# Altium PCB PCB.PcbDoc (part 9 of 10)
Units mm, origin at the board's own origin, x right, y up, seen from the top; angles counter-clockwise.
Board outline 100.5 x 147.95 mm, 6 copper layers (Top Layer, Layer 2 (GND), Layer 3, Layer 4, Layer 5 (AGND), Bottom Layer), stack 1.449 mm thick; 511 components, 297 nets, 1620 pads, 565 vias.
Unrouted connection lines stored in the file: 597.
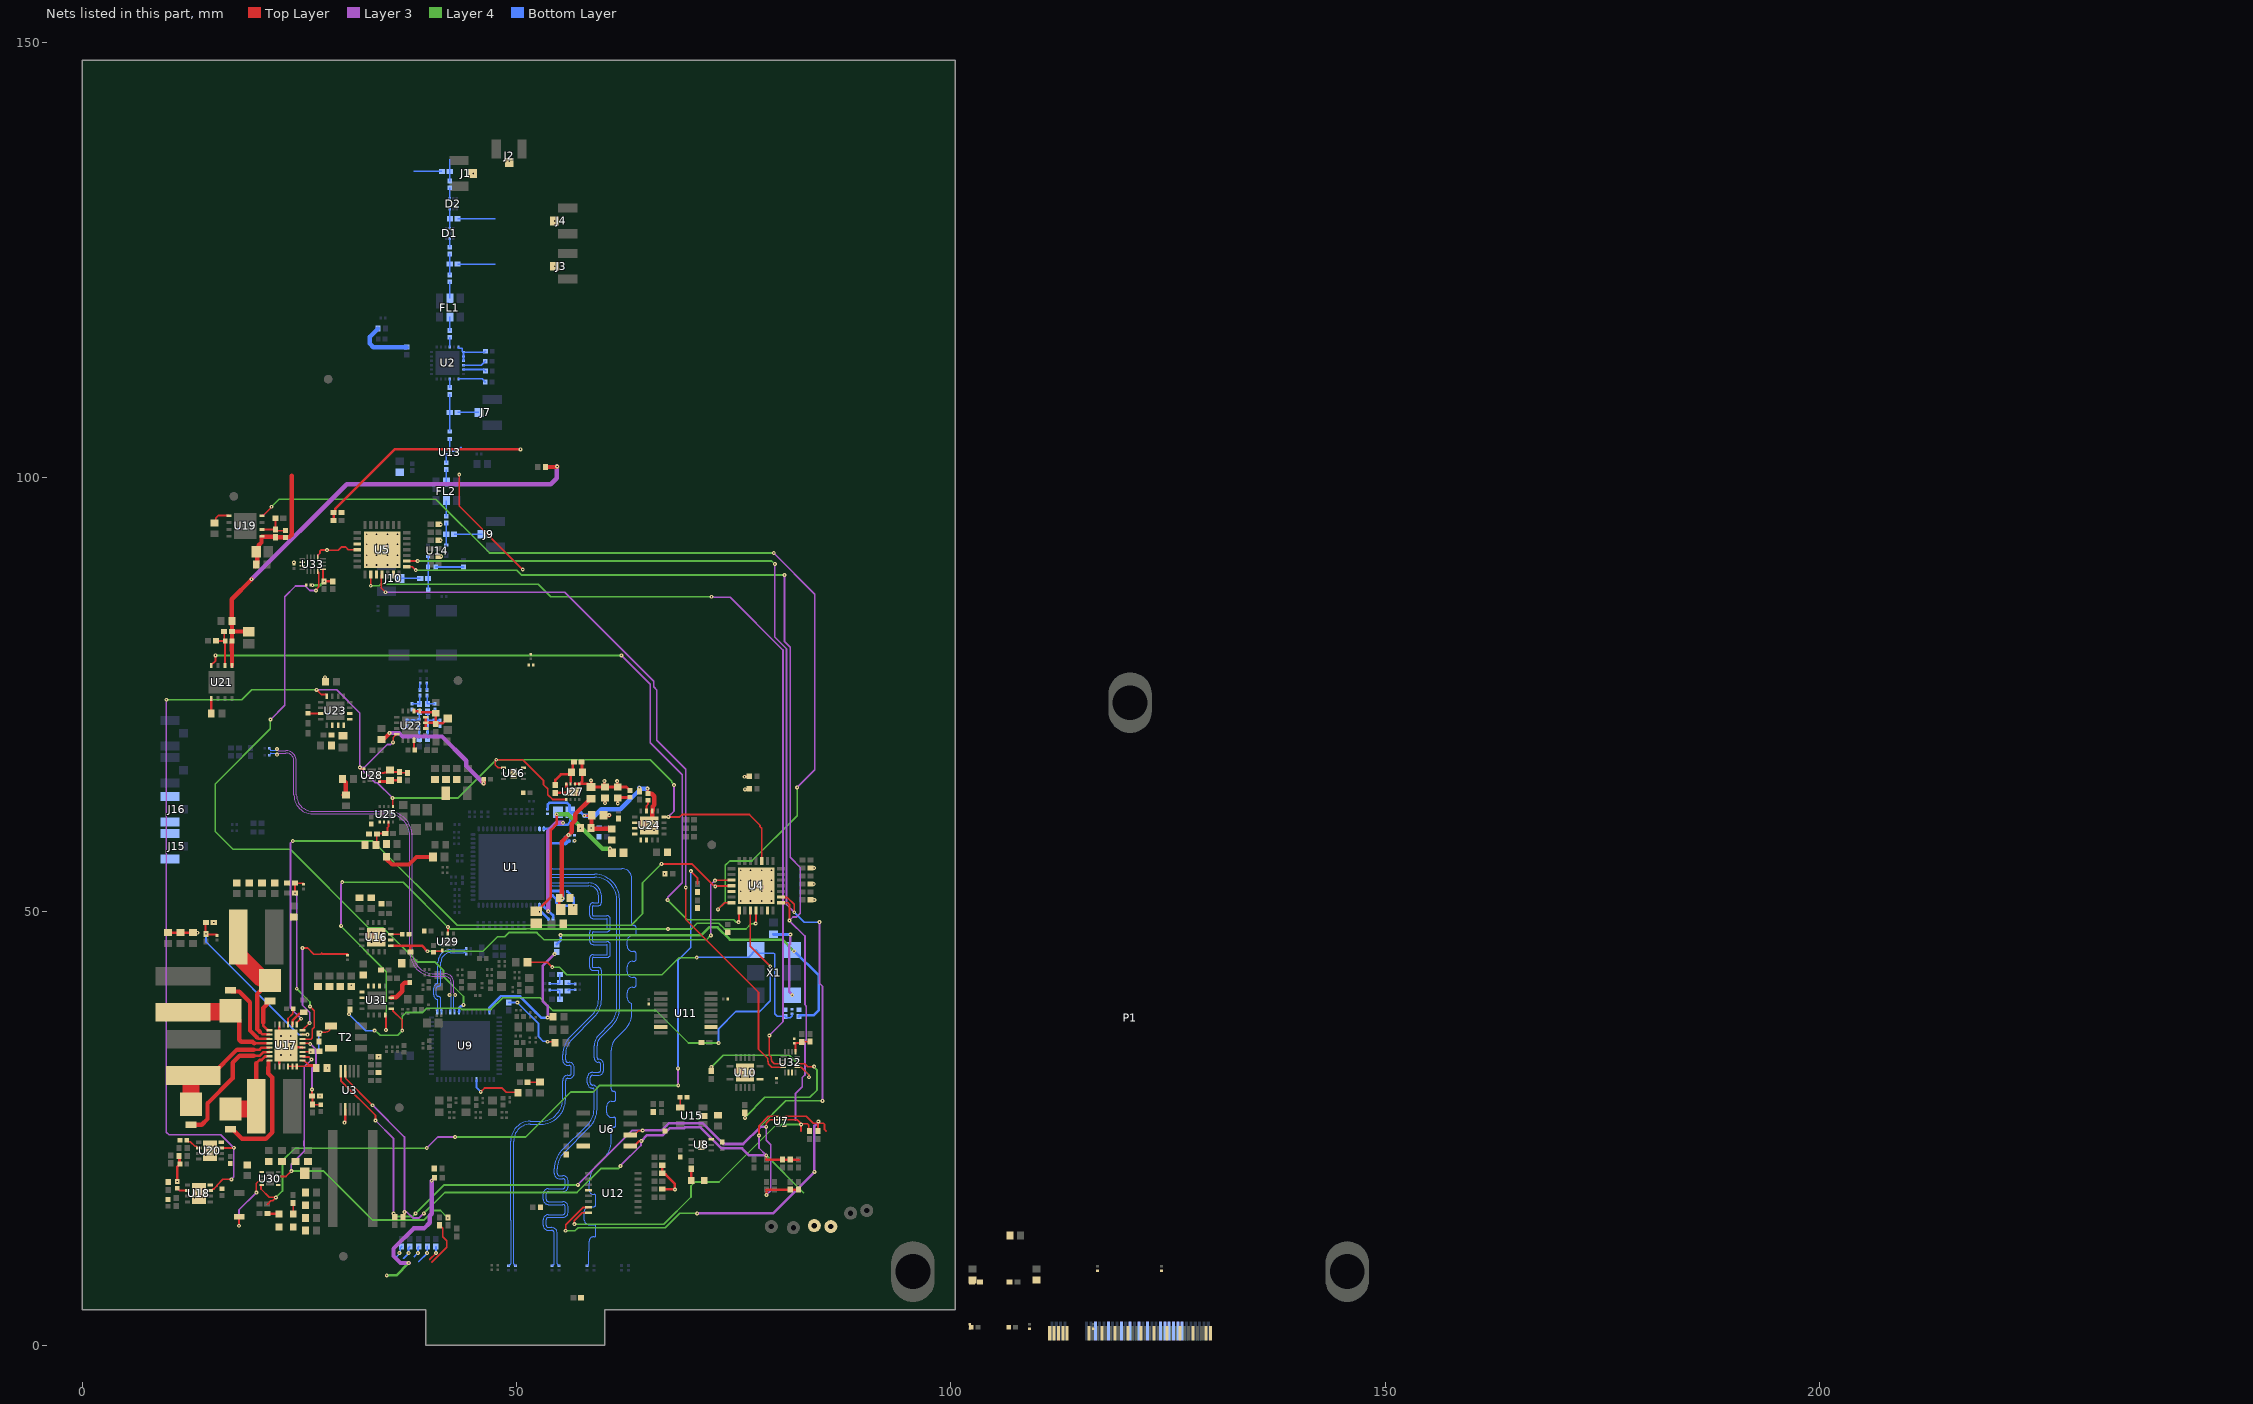
[diagram p6: the nets of this part, all layers, seen from the top]

## Via types
v1: diameter 0.45, hole 0.15, Top Layer to Bottom Layer, 432 vias
v2: diameter 0.5, hole 0.2, Top Layer to Bottom Layer, 132 vias
v3: diameter 0.6, hole 0.2, Top Layer to Bottom Layer, 1 vias

## Nets (pads, with @x,y where several pads share a name; then routed paths per layer and width w, separated by ;. In a path a pad name is that pad's centre, name@x,y a point inside that pad or via, vN(x,y) a via of type N, cw(c..) or ccw(c..) an arc to the next point about the centre after c; other vN are vias at no path point) (continued)
CMLout2_P: C18.1 U1.25 | length 65.2
  Bottom Layer w0.138: U1.25@53.787,54.872 53.924,54.872 ccw(c53.924,55.011) 54.022,54.913 cw(c54.12,54.815) 54.12,54.953 62.104,54.953 cw(c62.104,53.813) 63.244,53.813 63.244,48.638 ccw(c63.48,48.638) 63.48,48.402 cw(c63.48,48.124) 63.758,48.124 63.758,47.527 cw(c63.48,47.527) 63.48,47.249 63.346,47.249 ccw(c63.346,46.633) 62.73,46.633 62.73,46.036 ccw(c63.346,46.036) 63.346,45.42 63.48,45.42 cw(c63.48,45.142) 63.758,45.142 63.758,44.545 cw(c63.48,44.545) 63.48,44.267 63.346,44.267 ccw(c63.346,43.651) 62.73,43.651 62.73,43.054 ccw(c63.346,43.054) 63.346,42.438 63.48,42.438 cw(c63.48,42.159) 63.758,42.159 63.758,41.563 cw(c63.48,41.563) 63.48,41.284 63.346,41.284 ccw(c63.346,40.668) 62.73,40.668 62.73,40.072 ccw(c63.346,40.072) 63.244,39.464 63.244,38.217 cw(c60.84,38.217) 62.54,36.517 61.45,35.427 ccw(c62.823,34.055) 60.882,34.055 60.882,29.612 ccw(c61.192,29.612) 61.192,29.302 cw(c61.192,29.098) 61.396,29.098 61.396,28.352 cw(c61.192,28.352) 61.192,28.148 60.909,28.148 ccw(c60.909,27.607) 60.368,27.607 60.368,26.861 ccw(c60.909,26.861) 60.909,26.319 61.192,26.319 cw(c61.192,26.115) 61.396,26.115 61.396,25.37 cw(c61.192,25.37) 61.192,25.166 ccw(c61.192,24.856) 60.882,24.856 60.882,23.516 cw(c58.342,23.516) 60.138,21.72 59.176,20.758 ccw(c61.207,18.727) 58.335,18.727 58.335,17.965 ccw(c58.853,17.965) 58.853,17.447 58.923,17.447 cw(c58.923,17.267) 59.103,17.267 59.103,16.219 cw(c58.923,16.219) 58.923,16.039 58.315,16.039 ccw(c58.315,15.521) 57.797,15.521 57.797,14.474 ccw(c58.315,14.474) 58.315,13.957 58.923,13.957 cw(c58.923,13.776) 59.103,13.776 59.103,12.729 cw(c58.923,12.729) 58.923,12.549 58.853,12.549 ccw(c58.853,12.031) 58.335,12.031 58.335,10.929 58.326,10.92 58.326,9.46 cw(c58.188,9.46) 58.285,9.363 58.272,9.35 cw(c58.207,9.414) 58.207,9.323 ccw(c58.207,9.231) C18.1@58.143,9.296 ; C18.1@58.088,9.242 C18.1@58.142,9.296
CMLout3_N: C233.1 U1.26 | length 64.9
  Bottom Layer w0.138: U1.26@53.787,54.372 53.981,54.372 54.062,54.291 58.977,54.291 cw(c58.977,51.413) 61.855,51.413 61.855,38.911 cw(c58.983,38.911) 61.013,36.88 59.673,35.54 ccw(c60.679,34.534) 59.256,34.534 59.256,33.144 ccw(c59.409,33.144) 59.409,32.992 cw(c59.409,32.376) 60.025,32.376 60.025,31.779 cw(c59.409,31.779) 59.409,31.163 58.767,31.163 ccw(c58.767,30.885) 58.488,30.885 58.488,30.288 ccw(c58.767,30.288) 58.767,30.01 cw(c58.767,29.52) 59.256,29.52 59.256,27.245 cw(c56.385,27.245) 58.415,25.215 55.403,22.202 ccw(c57.199,20.406) 54.659,20.406 54.659,19.872 ccw(c54.938,19.872) 54.938,19.593 55.319,19.593 cw(c55.319,18.977) 55.935,18.977 55.935,18.38 cw(c55.319,18.38) 55.319,17.764 53.661,17.764 ccw(c53.661,17.486) 53.383,17.486 53.383,16.889 ccw(c53.661,16.889) 53.661,16.611 55.319,16.611 cw(c55.319,15.995) 55.935,15.995 55.935,15.398 cw(c55.319,15.398) 55.319,14.782 53.661,14.782 ccw(c53.661,14.503) 53.383,14.503 53.383,13.907 ccw(c53.661,13.907) 53.661,13.628 54.043,13.628 cw(c54.043,13.012) 54.659,13.012 54.659,9.811 54.65,9.802 54.65,9.46 ccw(c54.788,9.46) 54.69,9.363 54.704,9.35 ccw(c54.769,9.414) 54.769,9.323 cw(c54.769,9.231) 54.833,9.296 C233.1@54.888,9.242
CMLout3_P: C234.1 U1.27 | length 64.4
  Bottom Layer w0.138: U1.27@53.787,53.872 53.981,53.872 54.062,53.953 58.977,53.953 cw(c58.977,51.413) 61.517,51.413 61.517,38.914 cw(c58.977,38.914) 60.773,37.117 59.433,35.777 ccw(c60.674,34.536) 58.919,34.536 58.919,33.144 ccw(c59.409,33.144) 59.409,32.654 cw(c59.409,32.376) 59.687,32.376 59.687,31.779 cw(c59.409,31.779) 59.409,31.501 58.767,31.501 ccw(c58.767,30.885) 58.151,30.885 58.151,30.288 ccw(c58.767,30.288) 58.767,29.672 cw(c58.767,29.52) 58.919,29.52 58.919,27.248 cw(c56.379,27.248) 58.175,25.452 55.163,22.439 ccw(c57.193,20.409) 54.322,20.409 54.322,19.872 ccw(c54.938,19.872) 54.938,19.255 55.319,19.255 cw(c55.319,18.977) 55.598,18.977 55.598,18.38 cw(c55.319,18.38) 55.319,18.102 53.661,18.102 ccw(c53.661,17.486) 53.045,17.486 53.045,16.889 ccw(c53.661,16.889) 53.661,16.273 55.319,16.273 cw(c55.319,15.995) 55.598,15.995 55.598,15.398 cw(c55.319,15.398) 55.319,15.12 53.661,15.12 ccw(c53.661,14.503) 53.045,14.503 53.045,13.907 ccw(c53.661,13.907) 53.661,13.291 54.043,13.291 cw(c54.043,13.012) 54.322,13.012 54.322,12.182 54.322,9.951 54.312,9.942 54.312,9.46 cw(c54.175,9.46) 54.272,9.363 54.259,9.35 cw(c54.194,9.414) 54.194,9.323 ccw(c54.194,9.231) C234.1@54.129,9.296 ; C234.1@54.075,9.242 C234.1@54.129,9.296
CMLout4_N: C235.1 U1.28 | length 65.3
  Bottom Layer w0.138: C235.1@49.884,9.242 49.829,9.296 ccw(c49.765,9.231) 49.765,9.323 cw(c49.765,9.414) 49.7,9.35 49.687,9.363 cw(c49.784,9.46) 49.646,9.46 49.646,14.484 49.642,14.489 49.642,17.592 49.642,23.573 cw(c51.586,23.573) 51.586,25.517 52.754,25.517 ccw(c52.754,28.395) 55.632,28.395 55.632,30.546 cw(c55.893,30.546) 55.893,30.808 56.038,30.808 ccw(c56.038,31.424) 56.654,31.424 56.654,32.02 ccw(c56.038,32.02) 56.038,32.636 55.91,32.636 cw(c55.91,32.915) 55.632,32.915 55.632,33.515 cw(c58.172,33.515) 56.376,35.311 58.931,37.866 ccw(c56.9,39.897) 59.772,39.897 59.772,43.169 ccw(c59.379,43.169) 59.379,43.561 58.805,43.561 cw(c58.805,43.616) 58.75,43.616 58.75,44.66 cw(c58.805,44.66) 58.805,44.715 60.402,44.715 ccw(c60.402,45.107) 60.794,45.107 60.794,46.151 ccw(c60.402,46.151) 60.402,46.544 58.805,46.544 cw(c58.805,46.599) 58.75,46.599 58.75,47.642 cw(c58.805,47.642) 58.805,47.697 60.402,47.697 ccw(c60.402,48.09) 60.794,48.09 60.794,49.134 ccw(c60.402,49.134) 60.402,49.526 58.805,49.526 cw(c58.805,49.581) 58.75,49.581 58.75,50.625 cw(c58.805,50.625) 58.805,50.68 59.379,50.68 ccw(c59.379,51.072) 59.772,51.072 59.772,51.831 ccw(c58.312,51.831) 58.312,53.291 54.12,53.291 cw(c54.12,53.429) 54.022,53.331 ccw(c53.924,53.233) 53.924,53.372 U1.28@53.787,53.372
CMLout4_P: C236.1 U1.29 | length 64.8
  Bottom Layer w0.138: C236.1@49.071,9.242 C236.1@49.125,9.296 ; C236.1@49.126,9.296 cw(c49.19,9.231) 49.19,9.323 ccw(c49.19,9.414) 49.255,9.35 49.268,9.363 ccw(c49.171,9.46) 49.309,9.46 49.3,14.468 49.304,14.473 49.304,23.573 cw(c51.586,23.573) 51.586,25.855 52.754,25.855 ccw(c52.754,28.395) 55.294,28.395 55.294,30.546 cw(c55.893,30.546) 55.893,31.145 56.038,31.145 ccw(c56.038,31.424) 56.316,31.424 56.316,32.02 ccw(c56.038,32.02) 56.038,32.299 55.91,32.299 cw(c55.91,32.915) 55.294,32.915 55.294,33.517 cw(c58.166,33.517) 56.135,35.548 58.69,38.103 ccw(c56.894,39.899) 59.434,39.899 59.434,43.169 ccw(c59.379,43.169) 59.379,43.224 58.805,43.224 cw(c58.805,43.616) 58.412,43.616 58.412,44.66 cw(c58.805,44.66) 58.805,45.053 60.402,45.053 ccw(c60.402,45.107) 60.456,45.107 60.456,46.151 ccw(c60.402,46.151) 60.402,46.206 58.805,46.206 cw(c58.805,46.599) 58.412,46.599 58.412,47.642 cw(c58.805,47.642) 58.805,48.035 60.402,48.035 ccw(c60.402,48.09) 60.456,48.09 60.456,49.134 ccw(c60.402,49.134) 60.402,49.188 58.805,49.188 cw(c58.805,49.581) 58.412,49.581 58.412,50.625 cw(c58.805,50.625) 58.805,51.017 59.379,51.017 ccw(c59.379,51.072) 59.434,51.072 59.434,51.831 ccw(c58.312,51.831) 58.312,52.953 54.12,52.953 ccw(c54.12,52.815) 54.022,52.913 cw(c53.924,53.011) 53.924,52.872 U1.29@53.787,52.872
CTRL_VCXO: C222.1 R89.1 U9.41 | length 17.5
  Top Layer w0.3: v1(53.567,37.811) 54.13,37.811 C222.1@54.208,37.889
  Layer 3 w0.3: v1(53.567,37.811) 53.567,39.145 53.006,39.706 53.006,43.727 v1(54.38,45.1)
  Bottom Layer w0.3: U9.41@46.861,38.452 46.861,38.928 48.171,40.238 50.403,40.238 52.881,37.76 52.903,37.782 53.538,37.782 v1(53.567,37.811)
DCDC_PG1: R137.1 U4.25 U17.23 | length 82.8
  Top Layer w0.2: U17.23@24.684,36.986 24.684,37.211 25.132,37.658 v1(25.195,37.658) ; v1(66.673,55.489) 70.173,55.489 72.628,53.034 v1@72.998,53.034 ; v1(72.871,52.898) 72.909,52.936 74.682,52.936 U4.25@74.72,52.974
  Layer 3 w0.2: v1(24.23,58.131) 23.959,57.86 23.959,38.894 v1(25.195,37.658)
  Layer 4 w0.2: v1(24.23,58.131) 33.425,58.131 43.144,48.411 50.946,48.411 50.963,48.428 63.181,48.428 64.489,49.736 64.489,53.305 v1(66.673,55.489) ; v1(25.195,37.658) v1@25.231,37.694
DCDC_PG2: R136.1 U4.26 U30.8 | length 84.9
  Top Layer w0.2: U30.8@20.639,18.506 20.595,18.506 20.57,18.481 20.57,18.058 21.525,17.103 22.251,17.103 v1(22.28,17.074) 21.909,16.703 21.713,16.703 21.332,16.322 21.282,16.322 21.308,16.297 ; v1(70.051,54.651) 70.813,53.889 70.813,53.17
  Layer 3 w0.2: v1(39.648,22.774) 40.918,24.044 v1(42.924,24.044) ; v1(68.578,31.952) 68.591,31.94 68.591,30 v1(68.604,29.987)
  Layer 4 w0.2: v1@22.193,16.988 v1(22.28,17.074) 23.036,17.831 23.036,21.301 24.484,22.748 39.622,22.748 v1(39.648,22.774) ; v1(42.924,24.044) 51.046,24.044 56.228,29.225 58.825,29.225 59.587,29.987 v1(68.604,29.987)
  Bottom Layer w0.2: v1(68.578,31.952) 68.578,44.395 70.051,45.868 v1(70.051,54.651)
DGND: C85.1 C86.1 C87.1 C88.1 C89.1 C90.1 C91.1 C95.1 FB35.2 R70.1 U1.16 U1.33 U24.6 U24.17 U26.3 U26.7 | length 42.7
  Top Layer w0.3: v1(57.798,61.026) 58.607,61.026 58.622,61.041 FB35.2@58.658,61.077 ; R70.1@64.133,63.806 v1(64.133,64.252) ; v1(65.048,64.15) 65.076,64.122 65.076,63.648 C87.1@65.124,63.601
  Top Layer w0.5: FB35.2@58.622,61.041 58.622,59.64 v1(58.604,59.622) C86.1@58.586,59.604 58.642,59.548 60.902,59.548 C85.1@60.958,59.492 ; C87.1@65.124,63.601 65.124,63.596 65.144,63.576 65.55,63.576 65.844,63.282 65.844,62.289 65.651,62.097 65.651,61.634 U24.6@65.601,61.584 65.601,60.234 U24.17@65.276,59.909
  Layer 3 w0.5: v1(53.643,50.053) 53.643,59.263 54.602,60.222 v1(55.342,60.222)
  Bottom Layer w0.3: U1.33@53.137,50.722 53.137,50.572 53.166,50.544 53.166,50.531 v1(53.643,50.053) 54.202,49.571 C88.1@54.202,49.287 ; U1.16@53.137,59.522 53.815,59.522 54.303,60.01 55.904,60.01 56.081,60.188 56.081,60.253 56.161,60.333 C90.1@56.161,61.433 ; C89.1@53.567,61.775 53.577,61.775 53.577,62.332 53.77,62.525 55.802,62.525 56.081,62.245 56.081,61.512 C90.1@56.161,61.433 ; v1(57.798,61.026) 57.417,61.407 56.186,61.407 C90.1@56.161,61.433
  Bottom Layer w0.5: v1(57.798,61.026) 58.99,61.026 59.741,61.777 60.933,61.777 60.937,61.774 61.924,61.774 64.133,63.983 v1(64.133,64.252) 64.235,64.15 v1(65.048,64.15)
  other v2: 64.726,59.359 65.826,59.359 64.726,60.459 65.826,60.459
DRGND: C127.1 C128.1 C129.1 C130.1 C132.1 C133.1 C134.1 C135.1 FB5.1 FB6.1 FB7.1 FB8.1 FB9.1 FB35.1 FB36.1 R74.1 U1.18 U1.31 U27.4 U27.9 | length 13.4
  Top Layer w0.3: R74.1@54.441,63.668 56.335,63.668 v1(56.462,63.795) 56.162,63.795 55.812,64.145 55.812,64.3 55.737,64.375 55.737,64.67 U27.4@55.712,64.695 ; v1(60.171,62.474) 60.171,63.09 C129.1@60.173,63.093 ; v1(61.644,62.449) 61.644,63.086 C130.1@61.637,63.093 61.671,63.126 63.008,63.126 C128.1@63.041,63.16 ; v1(76.224,65.522) 76.242,65.54 76.764,65.54 FB7.1@76.782,65.558 ; v1(76.3,64.074) 76.324,64.098 76.759,64.098 FB8.1@76.782,64.122
  Top Layer w0.5: FB35.1@60.008,61.077 60.033,61.102 v1(60.653,61.102)
  Bottom Layer w0.3: U1.31@53.787,51.872 54.144,51.872 54.557,51.459 54.557,51.05 54.945,50.663 v1(56.564,50.663) 56.564,51.573 55.833,52.304 C134.1@55.833,52.314
  other v1: 67.029,54.346 56.691,58.156
DRVDD_1.25V: C127.2 C132.2 C133.2 C134.2 C135.2 FB14.2 U1.19 U1.30 | length 20.2
  Top Layer w0.3: C127.2@54.908,51.577 54.908,50.4 C135.2@55.077,50.231
  Top Layer w0.5: C127.2@55.21,51.6 55.21,58.047 v1(55.98,58.816) 56.365,59.201 56.365,60.119 56.75,60.504 56.75,61.222 58.521,62.993 FB14.2@58.571,62.993
  Bottom Layer w0.3: U1.30@53.787,52.372 55.209,52.372 C134.2@55.278,52.441 ; U1.19@53.787,57.872 55.599,57.872 55.791,57.872 56.04,58.121 56.05,58.121 C133.2@56.05,58.131 ; C134.2@55.233,52.314 C134.2@55.313,52.314
  Bottom Layer w0.5: v1@55.233,51.404 C134.2@55.233,52.314 ; 55.599,57.872 55.599,58.435 v1(55.98,58.816)
  other v1: 55.269,51.527
DVDD_1.25V: C86.2 C88.2 C89.2 C90.2 C91.2 FB12.2 U1.15 U1.34 | length 22
  Top Layer w0.3: v1(52.627,49.977) 52.627,50.362 53.937,51.672 53.937,59.416 54.608,60.087 v1(54.608,61.204)
  Layer 4 w0.5: v1(54.608,61.204) 55.918,61.204 59.881,57.242 v1(60.755,57.242)
  Bottom Layer w0.3: U1.34@52.637,50.722 52.637,50.013 52.627,50.003 v1(52.627,49.977) 52.656,49.949 52.863,49.949 53.662,49.149 C88.2@53.662,49.139
  other v1: 57.336,59.604
EN_04610: U4.4 U29.2 U31.4 | length 73.9
  Top Layer w0.2: U31.4@34.857,38.091 34.949,38 v1(34.949,36.363) ; U29.2@42.086,47.472 v1(42.086,48.225) ; v1(77.519,48.631) 77.544,48.656 77.544,50.099 U4.4@77.57,50.124
  Layer 3 w0.2: v1(29.792,48.352) 29.792,53.186 29.919,53.313 v1(29.919,53.381)
  Layer 4 w0.2: v1(29.792,48.352) 29.792,48.284 29.788,48.28 34.982,43.086 34.982,36.396 v1(34.949,36.363) ; v1(29.919,53.381) 36.93,53.381 v1(42.086,48.225) 42.315,47.996 51.097,47.996 51.114,48.013 51.549,48.013 51.566,47.996 v1(67.435,47.996) 70.102,47.996 70.763,48.656 73.279,48.656 73.939,47.996 76.407,47.996 76.995,48.583 77.471,48.583 v1(77.519,48.631)
EN_9690_Power: U4.17 U18.3 U20.3 U22.4 U23.4 U24.4 U25.5 U26.4 U27.5 U28.5 | length 178.3
  Top Layer w0.2: U18.3@14.725,17.884 14.85,17.884 15.025,18.059 15.149,18.059 15.504,18.414 15.504,18.488 16.185,19.169 v1(17.155,19.169) ; U20.3@15.999,22.792 17.431,22.792 v1(17.444,22.805) ; v1(26.973,75.53) 27.506,74.996 28.091,74.996 28.141,74.946 U23.4@28.141,74.796 ; v1@31.951,66.441 32.428,66.441 U28.5@32.433,66.445 ; v1(35.711,63.084) 35.73,63.064 35.73,62.123 U25.5@35.749,62.104 ; v1(35.761,69.484) 35.804,69.527 35.804,70.045 U22.4@36.189,70.429 ; U26.4@48.494,66.549 47.866,66.549 47.547,66.868 47.547,67.376 v1(47.649,67.478) 50.714,67.478 53.084,65.108 53.084,64.633 53.575,64.143 53.575,63.46 54.14,62.895 U27.5@55.712,62.895 ; v1(67.461,60.899) 68.781,60.899 69.051,61.169 76.799,61.169 78.021,59.947 78.021,59.782 78.22,59.582 U4.17@78.22,55.824
  Layer 3 w0.2: v1(9.676,74.387) 9.676,24.605 9.982,24.299 15.949,24.299 v1(17.444,22.805) 17.444,19.457 v1(17.155,19.169) ; v1(26.973,75.53) 29.284,75.53 31.951,72.863 v1(31.951,66.589) ; v1(35.711,63.084) 33.958,64.836 33.704,64.836 v1(31.951,66.589) ; v1(35.761,69.484) 35.513,69.236 35.119,69.236 32.472,66.589 v1(31.951,66.589) ; v1(67.461,60.899) 68.121,61.56 v1(68.121,64.557)
  Layer 4 w0.2: v1(9.676,74.387) 18.362,74.387 19.505,75.53 v1(26.973,75.53) ; v1(35.711,63.084) 43.28,63.084 v1@47.674,67.478 ; v1(47.649,67.478) v1@47.674,67.478 ; v1(68.121,64.557) 68.121,64.624 67.867,64.878 67.867,64.989 65.378,67.478 v1@47.674,67.478
EN_DCDC: R42.2 U17.16 U30.3 | length 38.1
  Top Layer w0.2: U30.3@22.539,19.506 22.542,19.509 23.449,19.509 v1(24.059,20.119) ; U17.16@25.334,33.336 25.409,33.261 26.087,33.261 v1(26.389,32.959) ; v1(42.086,14.722) R42.2@42.086,14.791
  Layer 3 w0.2: v1(24.059,20.119) 24.059,20.902 25.551,22.393 25.551,23.073 25.508,23.115 25.508,23.55 25.551,23.593 25.551,32.121 v1(26.389,32.959)
  Layer 4 w0.2: v1(24.059,20.119) 27.788,20.119 33.424,14.483 39.287,14.483 40.384,15.58 41.228,15.58 v1(42.086,14.722)
EN_LNA: R30.1 R33.2 U13.6 | length 26.7
  Top Layer w0.3: R30.1@28.936,95.037 R33.2@28.936,95.951 28.986,95.951 29.136,96.101 29.136,96.396 35.955,103.215 v1(50.455,103.215)
  Bottom Layer w0.2: U13.6@42.7,103.059 43.216,103.059 43.621,103.465
EN_PWR_RF_2.8: U4.1 U21.8 | length 90.5
  Top Layer w0.2: U21.8@14.826,78.319 14.806,78.338 15.34,78.871 v1(15.34,79.492) ; v1(75.563,48.783) 75.592,48.812 75.592,50.096 U4.1@75.62,50.124
  Layer 3 w0.2: v1(62.06,79.492) 65.378,76.174 65.378,69.434 69.067,65.744 69.067,53.336 67.384,51.654 v1(67.384,51.323)
  Layer 4 w0.2: v1(15.34,79.492) v1(62.06,79.492) ; v1(67.384,51.323) 69.645,49.063 75.004,49.063 75.284,48.783 v1(75.563,48.783)
EN_PWR_RF_5: U4.28 U19.8 | length 113.3
  Top Layer w0.2: U19.8@20.676,95.591 20.826,95.591 21.78,96.545 v1(21.78,96.606) ; v1(73.176,50.257) 73.943,51.024 U4.28@74.72,51.024
  Layer 3 w0.2: v1(79.602,91.278) 84.335,86.545 84.335,66.343 v1(82.294,64.303)
  Layer 4 w0.2: v1(21.78,96.606) 22.649,97.475 40.689,97.475 46.887,91.278 v1(79.602,91.278) ; v1(73.176,50.257) 74.014,51.095 74.014,55.311 74.522,55.819 77.087,55.819 82.294,61.026 v1(82.294,64.303)
EN_TRANSLATOR_2.5_1.8: R145.2 U5.24
GND: C33.1 C34.1 C35.1 C36.1 C37.1 C38.1 C39.1 C40.2 C41.2 C42.2 C43.2 C44.1 C45.1 C46.1 C47.1 C48.1 C50.1 C51.1 C52.1 C53.1 C54.1 C56.1 C57.1 C58.1 C59.1 C60.1 C62.1 C63.1 C64.1 C65.1 C69.1 C70.1 C76.1 C80.1 C81.1 C94.1 C112.1 C131.1 C147.1 C148.1 C149.1 C168.1 C230.1 C231.1 C237.1 C238.1 C239.1 C240.2 C241.1 C242.2 C243.2 C244.2 C247.1 C248.1 C249.1 C250.1 C251.2 C?.1 D7.2 D8.2 D9.2 FB31.1 FB32.1 FB33.1 FB34.1 J15.1 J15.3 J16.1 J16.3 P1.1 P1.3 P1.9 P1.15 P1.21 P1.24 P1.27 P1.30 P1.33 P1.34 P1.38 P1.39 P1.42 P1.45 P1.48 P1.51 P1.54 P1.57 P1.59 P1.61 P1.63 P1.65 P1.67 R20.1 R33.1 R41.1 R51.1 R53.1 R57.1 R58.1 R60.2 R81.1 R85.1 R116.1 R117.1 R118.1 R119.1 R120.1 R121.1 R122.1 R129.2 R130.2 R141.1 R142.1 R143.1 R?.2@103.33,7.35 T2.5 U3.7 U4.6 U4.29 U5.6 U5.29 U6.4 U7.1 U8.3 U8.7 U10.7 U10.15 U11.7 U11.10 U12.4 U15.2 U16.6 U16.17 U17.10 U17.18 U17.27 U17.29 U18.4 U18.9 U20.4 U20.9 U30.1 U30.5 U32.6 U32.7 U33.6 U33.7 | length 53.4
  Top Layer w0.3: C58.1@9.847,47.566 C57.1@11.308,47.566 C56.1@12.747,47.566 ; v1(10.919,18.924) 10.919,20.608 11.242,20.932 C70.1@11.247,20.932 11.192,20.987 11.192,21.826 R85.1@11.137,21.88 ; U17.10@22.659,32.514 22.659,33.811 U17.29@23.434,34.586 ; U17.27@22.659,36.657 22.659,35.361 U17.29@23.434,34.586 ; U17.18@25.334,34.336 25.309,34.361 23.434,34.361 U17.29@23.434,34.586 ; v1(30.173,25.695) 30.173,25.735 30.27,25.832 U3.7@30.27,27.228 ; v1@35.022,8.089 v1(35.05,8.118) ; R143.1@66.768,18.049 66.793,18.024 68.197,18.024 68.203,18.03 68.203,18.674 67.148,19.728 66.91,19.728 R142.1@66.76,19.878 66.764,19.882 66.764,20.789 R141.1@66.768,20.793
  Top Layer w0.5: C147.1@29.978,65.279 29.978,65.229 30.343,64.864 C112.1@30.343,63.43 ; C112.1@30.097,63.388 C112.1@30.15,63.512 ; C76.1@34.427,69.804 34.664,69.804 35.355,70.495 v1(35.355,70.551) ; v1(46.201,64.76) 46.201,65.233 C94.1@46.217,65.249 ; C81.1@67.359,56.785 C81.1@67.359,56.835
  Layer 3 w0.5: v1(35.355,70.551) 36.473,70.551 36.87,70.154 41.416,70.154 44.2,67.37 44.2,66.761 v1(46.201,64.76) ; v1(37.565,9.54) 36.634,9.54 35.823,10.351 35.823,11.199 38.152,13.528 39.338,13.528 39.992,14.183 39.992,14.98 40.232,15.219 v1(40.232,19.015)
  Layer 4 w0.3: v1(35.05,8.118) 36.142,8.118 v1(37.565,9.54)
  other v1: 68.223,17.999 27.365,28.768 28.218,31.994 34.11,33.289 30.961,41.501 13.257,47.564 84.275,51.323 84.199,53.178 84.25,55.006 27.938,76.977 24.357,90.196 41.324,90.897 41.248,92.751 41.248,94.554
  other v2: 12.925,17.059 13.925,17.059 12.925,18.059 13.925,18.059 14.199,21.967 15.199,21.967 14.199,22.967 15.199,22.967 75.792,30.96 76.792,30.96 75.792,31.96 76.792,31.96 22.884,33.486 23.984,33.486 22.884,34.586 23.984,34.586 22.884,35.686 23.984,35.686 33.282,46.501 34.382,46.501 33.282,47.601 34.382,47.601 75.8,51.204 76.935,51.204 78.205,51.204 79.34,51.204 75.8,52.339 76.935,52.339 78.205,52.339 79.34,52.339 75.8,53.609 76.935,53.609 78.205,53.609 79.34,53.609 75.8,54.744 76.935,54.744 78.205,54.744 79.34,54.744 32.739,89.888 33.874,89.888 35.144,89.888 36.279,89.888 32.739,91.023 33.874,91.023 35.144,91.023 36.279,91.023 32.739,92.293 33.874,92.293 35.144,92.293 36.279,92.293 32.739,93.428 33.874,93.428 35.144,93.428 36.279,93.428
GND_VCXO: C177.1 C209.1 C210.1 FB29.1 X1.3 | length 9.1
  Layer 3 w0.3: v1(81.507,47.361) 81.507,46.328 81.364,46.185 81.364,40.788 81.735,40.417 v1(81.735,40.376)
  Bottom Layer w0.3: FB29.1@79.576,47.397 79.613,47.361 v1(81.507,47.361)
I2C0_SCL: R17.2 R47.2 R128.1 TP2.1 U3.5 U4.8 U5.8 U6.6 U7.6 | length 196.9
  Top Layer w0.2: U3.5@29.77,31.628 29.77,30.527 33.756,26.541 v1(33.756,25.947) ; U5.8@37.359,89.708 37.986,89.708 v1(38.386,89.308) ; U6.6@63.077,24.284 63.552,24.284 64.025,24.758 64.466,24.758 v1(64.514,24.806) ; v1(78.738,25.212) 78.738,25.619 79.145,26.025 U7.6@80.151,26.025 ; v1(78.764,17.364) 78.764,17.98 ; U4.8@80.42,51.024 81.196,51.024 81.405,50.815 v1(81.405,48.961)
  Top Layer w0.3: 78.764,17.98 79.678,17.98 80.592,17.98 R17.2@81.507,17.98 R128.1@82.447,17.98
  Layer 3 w0.2: v1(33.756,25.947) 35.838,23.866 v1(35.838,15.23) ; v1(57.047,18.532) 63.32,24.806 v1(64.514,24.806) ; v1(78.738,25.212) 78.738,23.694 79.263,23.169 79.263,17.863 v1(78.764,17.364) ; v1(80.846,88.738) 80.846,81.055 81.49,80.412 81.49,56.237 82.65,55.077 82.65,49.799 82.226,49.376 81.82,49.376 v1(81.405,48.961) 83.192,47.175 83.192,39.27 83.353,39.109 83.353,35.233 83.192,35.072 83.192,31.196 82.887,30.891 82.887,29.832 82.116,29.062 82.116,25.968
  Layer 3 w0.3: v1(64.514,24.806) 66.673,24.806 67.52,25.652 71.389,25.652 73.801,23.24 76.08,23.24 78.052,25.212 v1(78.738,25.212)
  Layer 4 w0.2: v1(35.838,15.23) 35.886,15.23 36.233,14.883 38.005,14.883 v1(38.378,15.255) 41.654,18.532 v1(57.047,18.532) ; v1(38.386,89.308) 50.03,89.308 50.601,88.738 v1(80.846,88.738)
I2C0_SCL_2.5V: R126.1 U7.3 U12.8 | length 38.6
  Top Layer w0.2: v1(56.64,14.011) 56.64,14.388 57.569,15.317 U12.8@58.261,15.317 ; U7.3@80.821,26.025 82.291,26.025 v1@82.751,25.564 ; 82.751,24.722 v1(82.751,25.492) v1@82.751,25.564 ; R126.1@83.717,24.722 83.64,24.799 83.64,25.415 83.492,25.564 v1@82.751,25.564
  Layer 4 w0.2: v1(56.64,14.011) 66.953,14.011 70.077,17.135 70.077,18.405 70.534,18.862 73.294,18.862 79.924,25.492 v1(82.751,25.492)
I2C0_SDA: R18.2 R45.2 R127.1 TP1.1 U3.4 U4.9 U5.9 U6.5 U7.5 | length 205.6
  Top Layer w0.2: U3.4@30.27,31.628 30.32,31.578 30.32,30.779 33.397,27.701 v1(33.425,27.701) ; R45.2@36.904,14.853 37.082,15.031 v1(37.082,15.408) ; U5.9@37.359,90.358 v1(38.606,90.358) ; v1(77.9,24.222) 77.9,25.346 78.979,26.425 U7.5@80.151,26.425 ; v1(78.738,21.936) 78.738,21.471 78.764,21.446 ; U4.9@80.42,51.674 80.478,51.617 81.17,51.617 81.964,50.822 v1(81.964,49.926)
  Top Layer w0.3: U6.5@63.077,23.014 63.552,23.014 64.095,23.558 64.333,23.558 v1(64.362,23.587) ; 78.764,21.446 79.678,21.446 R18.2@80.592,21.446 R127.1@81.507,21.446 82.447,21.446
  Layer 3 w0.2: v1(33.425,27.701) 37.082,24.044 v1(37.082,15.408) 37.356,15.408 38.033,14.73 38.792,14.73 v1(39.317,15.255) ; v1(61.949,20.716) 64.314,23.082 64.314,23.539 v1(64.362,23.587) ; v1(77.9,24.222) 77.9,22.774 v1(78.738,21.936) ; v1(79.729,90.008) 79.729,81.607 81.071,80.265 81.071,50.82 v1(81.964,49.926) ; v1(84.86,48.783) 84.86,41.748 85.207,41.4 v1@85.207,28.277
  Layer 3 w0.3: v1(64.362,23.587) 65.026,24.251 66.825,24.251 67.638,25.064 69.276,25.064 69.364,25.152 71.182,25.152 73.594,22.74 75.97,22.74 76.774,21.936 v1(78.738,21.936)
  Layer 4 w0.2: v1(38.606,90.358) 79.378,90.358 v1(79.729,90.008) ; v1(39.317,15.255) 41.713,17.651 56.938,17.651 59.698,20.412 61.695,20.412 61.949,20.666 v1(61.949,20.716) ; v1(77.9,24.222) 77.9,25.117 80.993,28.209 v1(85.215,28.209) ; v1(78.738,21.936) 83.031,17.643
  Bottom Layer w0.2: v1(81.964,49.926) 83.107,48.783 v1(84.86,48.783)
I2C0_SDA_2.5V: R19.1 U7.4 U12.7 | length 48.4
  Top Layer w0.2: v1(55.65,13.249) 55.65,13.963 57.604,15.917 58.211,15.917 U12.7@58.261,15.967 ; U7.4@80.821,26.375 80.968,26.375 81.018,26.425 83.342,26.425 84.148,25.619 84.565,25.619 ; R19.1@84.682,24.722 84.682,25.501 84.565,25.619 ; 85.647,24.722 85.447,24.922 85.447,25.488 85.317,25.619 84.565,25.619
  Layer 3 w0.3: v1(70.788,15.255) 79.5,15.255 v1(84.275,20.031) 84.275,25.324 84.733,25.782 v1(84.733,25.822)
  Layer 4 w0.2: v1(55.65,13.249) 56.716,13.249 57.078,13.611 67.118,13.611 68.763,15.255 v1(70.788,15.255)
JTAG1: P1.14 R22.1 R24.1 | length 7.1
  Top Layer w0.2: 39.983,9.952 v1(40.714,10.683) ; 40.233,9.637 41.951,11.354 41.951,12.102 41.486,12.566 41.486,13.526 R24.1@41.121,13.891
  Bottom Layer w0.2: R22.1@40.689,11.42 40.714,11.395 v1(40.714,10.683)
JTAG2: P1.22 R36.1 | length 1.3
  Bottom Layer w0.2: 36.233,10.307 36.6,10.674 36.6,11.275 R36.1@36.752,11.427
  other v1: 36.498,10.683
JTAG3: P1.20 R48.1 | length 1.6
  Bottom Layer w0.2: 36.983,10.102 v1(37.565,10.683) 37.565,11.3 R48.1@37.692,11.427
JTAG4: P1.18 R104.1 | length 1.3
  Bottom Layer w0.2: 38.233,10.285 v1(38.632,10.683) 38.632,11.326 R104.1@38.733,11.427
JTAG5: P1.16 R105.1 | length 2.1
  Bottom Layer w0.2: 38.733,9.718 v1(39.698,10.683) 39.698,11.402 R105.1@39.724,11.427
Kom_PG: R102.1 U4.24 U16.5 | length 47.7
  Top Layer w0.2: v1(72.845,53.559) 72.878,53.592 74.687,53.592 U4.24@74.72,53.624
  Top Layer w0.3: U16.5@35.507,46.076 37.743,46.076 ; R102.1@37.786,45.354 37.743,45.398 37.743,46.076 ; v1(39.724,45.431) 39.078,46.076 37.743,46.076
  Layer 3 w0.2: v1(72.363,47.259) 72.346,47.276 72.346,53.116 72.789,53.559 v1(72.845,53.559)
  Layer 4 w0.2: v1(39.724,45.431) 46.125,45.431 47.801,47.107 48.625,47.107 49.099,47.581 52.332,47.581 53.153,46.76 71.863,46.76 v1(72.363,47.259)
LMK_CLKin0_N: C223.2 U9.32 | length 47.3
  Layer 3 w0.097: v1(22.401,68.067) cw(c22.578,68.067) 22.578,68.244 23.439,68.244 cw(c23.439,67.325) 24.357,67.325 24.357,63.422 ccw(c26.541,63.422) 26.541,61.237 35.152,61.237 cw(c35.152,58.697) 37.692,58.697 37.692,45.38 ccw(c40.529,45.38) 40.529,42.543 41.748,42.543 cw(c41.748,41.824) 42.467,41.824 42.467,41.188 42.463,41.183 42.463,40.635 42.286,40.458 v1(42.286,40.401)
  Bottom Layer w0.112: C223.2@21.524,67.986 21.586,68.048 ccw(c21.509,68.125) 21.618,68.125 cw(c21.727,68.125) 21.65,68.202 cw(c21.732,68.12) 21.732,68.236 22.274,68.236 22.372,68.139 cw(c22.3,68.067) v1(22.401,68.067) ; v1(42.286,40.401) 42.286,40.336 42.455,40.167 42.455,38.726 42.361,38.632 U9.32@42.361,38.452
LMK_CLKin0_P: C224.2 U9.33 | length 47.8
  Layer 3 w0.097: v1(22.401,68.717) ccw(c22.578,68.717) 22.578,68.541 23.439,68.541 cw(c23.439,67.325) 24.654,67.325 24.654,63.422 ccw(c26.541,63.422) 26.541,61.534 35.152,61.534 cw(c35.152,58.697) 37.989,58.697 37.989,45.38 ccw(c40.529,45.38) 40.529,42.84 41.748,42.84 cw(c41.748,41.824) 42.764,41.824 42.764,41.064 42.76,41.06 42.76,40.635 42.936,40.458 v1(42.936,40.401)
  Bottom Layer w0.112: C224.2@21.524,68.799 21.586,68.737 cw(c21.509,68.66) 21.618,68.66 ccw(c21.727,68.66) 21.65,68.582 ccw(c21.732,68.664) 21.732,68.548 22.274,68.548 22.372,68.646 ccw(c22.3,68.717) v1(22.401,68.717) ; U9.33@42.861,38.452 42.861,38.632 42.767,38.726 42.767,40.167 42.936,40.336 v1(42.936,40.401)
LMK_CLKin1_N: C225.2 U9.29 | length 10.4
  Bottom Layer w0.138: U9.29@40.861,38.452 ccw(c40.737,38.576) 40.912,38.576 40.912,38.713 cw(c40.964,38.713) 40.927,38.749 ccw(c40.891,38.785) 40.942,38.785 40.942,39.887 cw(c40.976,40.428) 40.434,40.428 40.434,41.173 cw(c40.976,41.173) 40.942,41.714 40.942,44.167 cw(c42.365,44.167) 42.365,45.59 42.53,45.59 42.539,45.599 43.936,45.599 ccw(c43.936,45.858) 44.118,45.675 44.194,45.751 C225.2@44.194,45.761
LMK_CLKin1_P: C226.2 U9.30 | length 9.9
  Bottom Layer w0.138: U9.30@41.361,38.452 cw(c41.485,38.576) 41.31,38.576 41.31,38.713 ccw(c41.259,38.713) 41.295,38.749 cw(c41.331,38.785) 41.28,38.785 41.28,39.92 ccw(c40.976,39.92) 40.976,40.224 cw(c40.976,40.428) 40.772,40.428 40.772,41.173 cw(c40.976,41.173) 40.976,41.377 ccw(c40.976,41.681) 41.28,41.681 41.28,44.167 cw(c42.365,44.167) 42.365,45.253 42.694,45.253 42.703,45.262 43.936,45.262 cw(c43.936,45.003) 44.118,45.186 44.194,45.11 C226.2@44.194,45.1
LMK_CLKsel: U9.34 U33.12 | length 76
  Top Layer w0.2: v1(26.897,86.958) 26.897,87.026 27.234,87.363 27.234,89.033 U33.12@27.109,89.158
  Layer 3 w0.2: v1(21.664,72.101) 23.314,73.75 23.314,86.253 24.546,87.485 25.659,87.485 26.185,86.958 v1(26.897,86.958)
  Layer 4 w0.2: v1(21.664,72.101) 21.639,72.075 21.639,71.034 15.289,64.684 15.289,59.223 17.346,57.165 23.925,57.165 32.939,48.151 34.61,48.151 38.556,44.206 40.593,44.206 41.598,43.201 41.598,42.515 43.889,40.224 v1(43.889,39.258)
  Bottom Layer w0.3: U9.34@43.361,38.452 43.391,38.482 43.391,38.897 43.596,39.102 43.693,39.102 43.849,39.258 v1(43.889,39.258)
LMK_CLKsel_3.3: U5.25 U33.1 | length 5.5
  Top Layer w0.2: U33.1@27.109,90.758 27.109,91.033 27.361,91.285 27.361,91.502 27.479,91.619 28.156,91.619 v1(28.167,91.608) 29.482,91.608 29.854,91.98 30.298,91.98 30.62,91.658 U5.25@31.659,91.658
LMK_PG_1.8: R109.1 U4.3 U31.5 | length 72
  Top Layer w0.2: U31.5@35.557,38.791 35.707,38.791 35.757,38.741 35.757,38.591 36.828,37.52 v1(36.828,36.287) ; U4.3@76.92,50.124 76.889,50.094 76.889,46.01 v1(79.195,43.703)
  Layer 4 w0.2: v1(33.653,36.287) 33.701,36.334 34.282,35.753 36.295,35.753 v1(36.828,36.287) 36.828,37.936 37.262,38.369 39.134,38.369 39.633,38.869 43.536,38.869 43.672,38.733 47.042,38.733 48.385,40.077 52.706,40.077 54.177,38.606 66.05,38.606 69.792,34.864 v1(73.252,34.864)
  Bottom Layer w0.2: v1(30.707,38.192) 32.612,36.287 v1(33.653,36.287) ; v1(73.252,34.864) 73.252,36.515 75.233,38.496 77.98,38.496 79.195,39.712 v1(79.195,43.703)
Net_IOE0: R25.2 U32.9 | length 14.9
  Top Layer w0.2: U32.9@82.356,32.08 82.767,32.08 83.666,31.181 v1(83.666,30.927)
  Layer 4 w0.2: v1(72.414,32.096) 73.768,33.45 81.397,33.45 83.666,31.181 v1(83.666,30.927)
Net_IOE0_3.3: U5.4 U32.4 | length 88.8
  Top Layer w0.2: U5.4@34.509,88.808 34.424,88.723 34.424,88.129 34.409,88.114 34.409,87.246 v1(34.898,86.756) ; v1(69.467,52.771) 69.467,49.088 77.849,40.706 77.849,34.157 78.92,33.086 78.92,32.763 78.97,32.712 78.97,32.478 79.369,32.08 U32.4@80.707,32.08
  Layer 3 w0.2: v1@34.949,86.756 55.538,86.756 65.778,76.516 65.778,75.866 66.14,75.504 66.14,69.713 69.467,66.386 v1(69.467,52.771)
Net_IOE1: R26.2 U32.10 | length 15.2
  Top Layer w0.2: R26.2@76.274,26.838 76.3,26.812 v1(76.3,26.254) ; U32.10@82.307,32.48 83.19,32.48 83.524,32.146 v1(84.25,32.146)
  Layer 4 w0.2: v1(76.3,26.254) 76.3,26.336 78.574,28.609 83.736,28.609 84.591,29.465 84.591,31.745 84.25,32.086 v1(84.25,32.146)
Net_IOE1_3.3: U5.2 U32.3 | length 101.5
  Top Layer w0.2: v1(33.209,87.509) U5.2@33.209,88.808 ; v1(79.094,35.728) 79.094,33.478 79.32,33.252 79.32,32.928 79.37,32.878 79.37,32.763 79.653,32.48 U32.3@80.707,32.48
  Layer 3 w0.2: v1(72.439,86.248) 72.487,86.201 72.741,86.201 72.744,86.198 74.573,86.198 80.671,80.099 80.671,37.305 v1(79.094,35.728)
  Layer 4 w0.2: v1(33.209,87.509) 34.193,87.509 34.365,87.681 52.495,87.681 53.928,86.248 v1(72.439,86.248)
Net_IOE2: U5.3
NetC1_1: C1.1 R2.2 R3.1 R6.2 | length 2.4
  Bottom Layer w0.165: R6.2@37.361,72.01 cw(c37.397,72.01) 37.397,72.046 C1.1@38.072,72.046 R3.1@38.783,72.046 38.783,72.967 cw(c38.809,72.967) R2.2@38.809,72.993
NetC2_1: C2.1 R3.2 R4.1 | length 1.5
  Bottom Layer w0.165: R4.1@38.783,69.887 38.789,69.887 C2.1@38.789,70.674 38.783,70.674 R3.2@38.783,71.396
NetC3_2: C3.2 R1.1 | length 0.8
  Bottom Layer w0.165: R1.1@38.859,75.52 38.859,76.262 cw(c38.91,76.262) C3.2@38.91,76.313
NetC4_2: C4.2 R5.1 R9.2 | length 0.5
  Bottom Layer w0.165: R9.2@40.587,73.27 ccw(c40.871,73.27) 40.871,72.986 40.968,72.986
NetC5_1: C5.1 R8.2
NetC5_2: C5.2 R6.1
NetC6_2: C6.2 R10.1 | length 0.8
  Bottom Layer w0.165: C6.2@39.647,76.313 39.647,75.571 ccw(c39.698,75.571) R10.1@39.698,75.52
NetC7_2: C7.2 R8.1 R11.2 R12.1 | length 2.4
  Bottom Layer w0.165: R12.1@39.748,72.041 R12.1@39.748,72.052 ; R11.2@39.748,73 R12.1@39.748,72.052 ; R8.1@41.171,72.015 40.496,72.015 cw(c40.496,72.052) C7.2@40.46,72.052 R12.1@39.748,72.052
NetC8_2: C8.2 R12.2 R13.1 | length 1.5
  Bottom Layer w0.165: R13.1@39.748,69.88 39.742,69.88 C8.2@39.742,70.674 39.748,70.674 R12.2@39.748,71.391
NetC11_1: C11.1 U2.13 | length 3.3
  Bottom Layer w0.2: U2.13@43.3,111.33 46.021,111.33 46.392,110.958 C11.1@46.397,110.958
NetC12_1: C12.1 U2.11 | length 2.6
  Bottom Layer w0.2: U2.11@43.875,112.405 46.23,112.405 C12.1@46.406,112.228
NetC13_1: C13.1 U2.10 | length 2.7
  Bottom Layer w0.2: U2.10@43.875,112.905 45.926,112.905 46.392,113.371 C13.1@46.397,113.371
NetC14_1: C14.1 U2.6 U2.7 U2.8 U2.9 | length 4.6
  Bottom Layer w0.2: U2.6@43.3,114.98 43.3,114.93 43.375,114.855 43.75,114.855 43.75,114.48 43.825,114.405 U2.7@43.875,114.405 ; U2.9@43.875,113.405 U2.8@43.875,113.905 U2.7@43.875,114.405 ; C14.1@46.406,114.514 46.297,114.405 U2.7@43.875,114.405
NetC21_1: C21.1 J2.2 R39.2 | length 2.5
  Bottom Layer w0.165: C21.1@42.307,134.106 42.3,134.113 R39.2@42.3,135.215 42.308,135.222 42.308,136.638
  other v2: 49.141,136.388
NetC21_2: C21.2 D2.1 | length 1.2
  Bottom Layer w0.165: D2.1@42.299,132.081 42.299,133.319 C21.2@42.307,133.326
NetC22_1: C22.1 D1.5 | length 1
  Bottom Layer w0.165: D1.5@42.307,127.468 42.307,127.016 42.308,127.015 C22.1@42.308,126.483
NetC22_2: C22.2 C23.1 R40.2 | length 2.4
  Bottom Layer w0.165: C23.1@42.308,123.286 42.3,123.293 R40.2@42.3,124.547 42.3,125.696 C22.2@42.308,125.703
NetC23_2: C23.2 FL1.2 | length 1.9
  Bottom Layer w0.165: FL1.2@42.308,120.611 C23.2@42.308,122.506
NetC24_1: C24.1 FL1.5 | length 1.6
  Bottom Layer w0.165: C24.1@42.3,116.889 42.307,116.896 FL1.5@42.307,118.471
NetC24_2: C24.2 U2.4 | length 1.1
  Bottom Layer w0.165: U2.4@42.3,114.98 C24.2@42.3,116.109
NetC25_1: C25.1 U2.15 | length 1
  Bottom Layer w0.165: C25.1@42.3,110.323 U2.15@42.3,111.33
NetC25_2: C25.2 L1.2 R43.2 | length 4.3
  Bottom Layer w0.165: L1.2@42.3,105.286 R43.2@42.3,107.457 C25.2@42.3,109.543
NetC28_1: C28.1 R44.2 U14.1 | length 2.6
  Bottom Layer w0.165: U14.1@41.9,92.177 R44.2@41.9,93.432 C28.1@41.9,94.743
NetC28_2: C28.2 FL2.5 | length 1.8
  Bottom Layer w0.165: C28.2@41.9,95.523 41.9,97.308 FL2.5@41.908,97.315
NetC29_1: C29.1 FL2.2 | length 1.4
  Bottom Layer w0.165: FL2.2@41.908,99.455 C29.1@41.908,100.882
NetC29_2: C29.2 U13.3 | length 1
  Bottom Layer w0.165: U13.3@41.893,102.652 41.893,101.677 C29.2@41.908,101.662
NetC31_2: C31.2 L2.2 R46.1 | length 17.2
  Top Layer w0.2: v1(43.389,100.305) 43.389,96.692 v1(50.709,89.372)
  Bottom Layer w0.2: L2.2@40.688,89.666 C31.2@43.875,89.666
NetC32_2: C32.2 L2.1 R49.2 U14.3 | length 3.8
  Bottom Layer w0.165: U14.3@39.8,90.877 39.808,90.87 L2.1@39.808,89.666 R49.2@39.808,88.352 C32.2@39.808,87.051
NetC37_2: C37.2 U15.4 | length 1.2
  Top Layer w0.2: C37.2@68.822,28.62 68.822,27.46 U15.4@68.848,27.434
NetC39_2: C39.2 U16.7 | length 1.3
  Top Layer w0.2: U16.7@35.507,47.376 36.809,47.376 C39.2@36.819,47.386
NetC49_1: C49.1 U17.25 | length 2.1
  Top Layer w0.2: U17.25@23.684,36.986 23.684,37.691 24.224,38.231 24.224,38.748 C49.1@24.276,38.801
NetC54_2: C54.2 U17.12 U17.13 U17.14 U17.15 | length 5
  Top Layer w0.2: U17.12@23.684,32.186 U17.13@24.184,32.186 U17.14@24.684,32.186 C54.2@26.617,32.172 ; U17.15@25.334,32.836 25.559,32.836 26.051,32.344 26.683,32.344 26.983,32.044 C54.2@26.983,31.994
NetC55_1: C55.1 R52.1 R53.2 U17.20 | length 21
  Top Layer w0.2: R53.2@24.477,53.279 R53.2@24.48,53.276 ; R52.1@24.48,52.151 R53.2@24.48,53.276 ; U17.20@25.334,35.336 25.366,35.304 26.321,35.304 26.481,35.464 26.481,36.455 26.693,36.667 26.693,38.599 v1(26.211,39.081) ; 25.474,53.254 24.502,53.254 R53.2@24.48,53.276
  Layer 3 w0.2: v1(24.484,52.111) 24.484,52.043 24.687,51.84 v1(24.687,41.113)
  Layer 4 w0.2: v1(24.687,41.113) 26.211,39.589 v1(26.211,39.081)
NetC61_1: C61.1 R59.2 R60.1 U17.19 | length 9.4
  Top Layer w0.2: U17.19@25.334,34.836 26.163,34.836 v1(26.236,34.763) ; v1(26.44,29.505) 26.44,28.794 R60.1@26.465,28.768 26.509,28.725 R59.2@26.509,27.77 C61.1@27.448,27.77
  Layer 3 w0.2: v1(26.236,34.763) 26.914,34.085 26.914,32.494 26.44,32.019 v1(26.44,29.505)
NetC66_1: C66.1 R61.1 R62.2 U19.6 | length 4
  Top Layer w0.2: U19.6@20.676,93.991 R61.1@22.244,93.991 ; R62.2@22.244,95.247 R61.1@22.244,93.991 ; C66.1@23.387,93.855 22.381,93.855 R61.1@22.244,93.991
NetC66_2: C66.2 C67.2 C68.2 FB2.1 FB3.1 R61.2 U19.5 | length 20.5
  Top Layer w0.5: C67.2@19.927,89.728 C67.2@20.065,89.866 ; C68.2@19.938,91.184 20.152,90.97 20.152,90.085 C67.2@20.023,89.957 ; C68.2@19.999,91.43 20.299,91.73 20.299,92.166 20.626,92.493 20.626,93.091 20.676,93.141 22.194,93.141 R61.2@22.244,93.091 22.253,93.083 23.379,93.083 C66.2@23.387,93.075 23.387,93.08 23.407,93.1 23.407,93.13 23.844,93.13 24.107,93.393 24.107,100.172
  Bottom Layer w0.5: FB2.1@34.028,117.127 34.028,117.107 33.08,116.159 33.08,115.403 33.504,114.98 FB3.1@37.366,114.98
NetC71_2: C71.2 U19.1 | length 2.4
  Top Layer w0.2: C71.2@15.349,94.541 15.349,95.274 15.666,95.591 U19.1@16.876,95.591
NetC72_1: C72.1 R63.1 R64.2 U21.6 | length 5.1
  Top Layer w0.2: R64.2@15.381,81.169 15.41,81.14 C72.1@16.455,81.14 ; R63.1@16.33,82.234 16.33,81.266 C72.1@16.455,81.14 ; U21.6@16.426,78.319 16.426,80.031 16.418,80.039 16.418,81.103 C72.1@16.455,81.14
NetC72_2: C72.2 C73.2 C74.2 FB1.1 R63.2 U21.5 | length 55.6
  Top Layer w0.3: FB1.1@53.308,101.163 FB1.1@53.308,101.183
  Top Layer w0.5: U21.5@17.226,78.319 17.226,80.016 17.21,80.031 17.21,81.12 17.23,81.14 C72.2@17.235,81.14 R63.2@17.23,82.234 ; C74.2@19.15,82.219 R63.2@17.23,82.234 ; v1(19.48,88.255) 19.48,88.23 17.21,85.96 C73.2@17.21,83.464 R63.2@17.23,82.234 ; FB1.1@53.308,101.183 54.608,101.183 v1(54.659,101.234)
  Layer 3 w0.5: v1(19.48,88.255) 30.43,99.205 53.934,99.205 54.608,99.879 v1@54.608,101.285
NetC75_2: C75.2 U21.1 | length 1.7
  Top Layer w0.3: U21.1@14.826,74.519 14.826,72.828 C75.2@14.842,72.812
NetC77_2: C77.2 FB4.1 R65.2 U22.10 U22.11 U22.12 U22.13 U22.14 | length 8.1
  Top Layer w0.3: U22.14@38.189,73.079 U22.13@38.839,73.079 38.839,72.954 40.569,72.954 C77.2@40.694,72.829 R65.2@40.694,71.579 ; U22.10@39.539,71.079 U22.11@39.539,71.729 ; U22.12@39.539,72.379 U22.11@39.539,71.729 ; FB4.1@42.061,72.245 42.011,72.245 41.444,71.678 40.802,71.678 R65.2@40.694,71.57 R65.2@40.694,71.579 ; U22.11@39.539,71.729 40.544,71.729 R65.2@40.694,71.579
NetC79_2: C79.2 U22.7 | length 1.3
  Top Layer w0.2: U22.7@38.189,69.729 38.189,68.525 C79.2@38.234,68.48
NetC82_2: C82.2 FB10.1 R67.2 U23.10 U23.11 U23.12 U23.13 U23.14
NetC84_2: C84.2 U23.7 | length 1.5
  Top Layer w0.2: C84.2@25.982,72.828 25.998,72.812 27.425,72.812 U23.7@27.441,72.796
NetC85_2: C85.2 FB12.1 R69.2 U24.10 U24.11 U24.12 U24.13 U24.14
NetC87_2: C87.2 U24.7 | length 1.3
  Top Layer w0.2: U24.7@64.951,61.584 64.96,61.593 64.96,62.184 65.124,62.347 C87.2@65.124,62.821
NetC92_1: C92.1 R71.1 R72.2 U25.3 | length 3.8
  Top Layer w0.2: C92.1@33.796,57.673 33.907,57.785 R71.1@33.907,58.918 33.983,58.994 R72.2@34.873,58.994 34.923,58.994 35.123,59.194 35.123,59.661 35.249,59.787 U25.3@35.249,60.304
NetC92_2: C92.2 C96.2 C97.2 C98.2 FB13.1 R71.2 U25.1 U25.2 | length 6.2
  Top Layer w0.5: C97.2@34.998,56.319 34.998,56.083 35.662,55.419 37.607,55.419 38.464,56.276 FB13.1@40.359,56.276
NetC126_1: C126.1 R73.1 R74.2 U27.3 | length 5.1
  Top Layer w0.3: R74.2@54.441,64.568 54.456,64.582 54.456,65.169 55.093,65.806 56.081,65.806 C126.1@56.208,65.933 ; 56.208,64.912 C126.1@56.208,65.933 ; R73.1@56.584,67.221 56.45,67.086 56.45,66.174 C126.1@56.315,66.039 C126.1@56.208,65.933
NetC126_2: C126.2 C128.2 C129.2 C130.2 FB14.1 R73.2 U27.1 U27.2 | length 11.5
  Top Layer w0.3: U27.2@56.712,64.695 U27.1@57.212,64.695 ; R73.2@57.484,67.221 57.525,67.18 57.525,66.08 C126.2@57.565,66.039 57.565,65.047 U27.1@57.212,64.695 ; v1(58.571,65.09) FB14.1@58.571,64.343 ; v1(60.095,65.039) 60.095,64.422 C129.2@60.173,64.343 ; v1(61.568,65.014) 61.568,64.412 C130.2@61.637,64.343 ; C128.2@63.041,63.94 63.041,63.945 62.643,64.343 C130.2@61.637,64.343 ; U27.1@57.212,64.695 58.169,64.695 58.521,64.343 FB14.1@58.571,64.343 ; FB14.1@58.571,64.343 C129.2@60.173,64.343 ; C129.2@60.173,64.343 C130.2@61.637,64.343
NetC142_1: C142.1 R75.1 R76.2 U28.3 | length 3.5
  Top Layer w0.2: U28.3@34.233,65.945 34.708,65.945 34.783,66.02 35.113,66.02 C142.1@35.413,66.32 35.659,66.074 R75.1@36.505,66.074 36.605,65.974 R76.2@37.438,65.974
NetC142_2: C142.2 C143.2 C144.2 C145.2 L8.1 R75.2 U28.1 U28.2 | length 3.1
  Top Layer w0.3: U28.2@34.233,65.445 U28.1@34.233,64.945 34.258,64.97 35.313,64.97 C142.2@35.413,65.07 35.465,65.122 36.453,65.122 R75.2@36.505,65.174 36.505,65.147 R75.2@36.655,64.997
NetC170_2: C170.2 R?.2@57.425,5.55 U29.4 | length 1.1
  Top Layer w0.2: C170.2@40.435,45.32 40.536,45.421 41.386,45.421 41.436,45.471 U29.4@41.436,45.522
NetC171_1: C171.1 R77.1 | length 8.1
  Top Layer w0.2: v1(53.567,35.017) 54.288,35.017 C171.1@54.415,34.89
  Bottom Layer w0.2: R77.1@49.096,39.538 v1(50.087,39.538) 52.525,37.099 52.525,35.575 53.042,35.059 53.524,35.059 v1(53.567,35.017)
NetC172_1: C172.1 R78.1 | length 1.4
  Top Layer w0.2: R78.1@51.266,30.343 52.688,30.343 C172.1@52.703,30.358
NetC173_1: C173.1 U9.5 | length 6.3
  Top Layer w0.2: v1(45.871,29.251) 46.294,29.674 48.323,29.674 48.798,29.199 50.173,29.199 C173.1@50.173,29.149
  Bottom Layer w0.2: U9.5@45.361,30.652 45.391,30.623 45.391,29.731 v1(45.871,29.251)
NetC175_2: C175.2 R90.1 | length 0.9
  Bottom Layer w0.165: R90.1@55.878,40.859 56.027,41.008 C175.2@56.763,41.008
NetC176_1: C176.1 R79.1 R90.2 | length 2.2
  Bottom Layer w0.165: C176.1@53.812,40.968 54.869,40.968 R90.2@54.978,40.859 54.981,40.856 R79.1@54.981,39.901
NetC177_2: C177.2 R89.2 X1.1 | length 40.2
  Layer 4 w0.3: v1(55.065,47.285) 71.271,47.285 72.16,48.174 73.125,48.174 74.538,46.761 80.609,46.761 v1(81.939,45.431)
  Bottom Layer w0.3: R89.2@54.608,46.229 55.065,46.686 v1(55.065,47.285) ; X1.1@81.96,45.452 84.783,42.628 84.783,38.674 84.154,38.045 82.617,38.045 82.497,37.925 C177.2@82.497,37.92
NetC178_2: C178.2 R91.1 | length 0.9
  Bottom Layer w0.165: R91.1@55.878,41.82 56.028,41.67 C178.2@56.763,41.67
NetC179_1: C179.1 R84.2 R91.2 | length 2.2
  Bottom Layer w0.165: C179.1@53.812,41.704 54.863,41.704 R91.2@54.978,41.82 54.981,41.822 R84.2@54.981,42.771
NetC209_2: C209.2 C210.2 FB26.2 X1.6 | length 39.8
  Top Layer w0.165: FB26.2@51.255,44.161 53.541,44.161 v1(54.1,43.602)
  Layer 4 w0.174: v1(54.1,43.602) 54.9,43.602 55.768,42.734 66.74,42.734 68.7,44.694 v1(70.737,44.694)
  Bottom Layer w0.165: v1(70.737,44.694) 70.814,44.694 70.879,44.758 76.718,44.758 X1.6@77.535,45.576 77.884,45.227 79.629,45.227 79.703,45.153 79.703,38.242 80.017,37.929 C210.2@80.923,37.929 81.066,37.785 81.5,37.785 81.71,37.995 C209.2@81.71,38.256
NetC219_2: C219.2 FB30.1 R86.2 U31.10 U31.11 U31.12 U31.13 U31.14
NetC221_1: C221.1 U31.7 | length 3.3
  Top Layer w0.5: U31.7@35.557,40.091 35.607,40.141 36.136,40.141 36.833,40.839 36.833,41.547 37.101,41.815 37.672,41.815 37.692,41.835 C221.1@37.692,41.84
NetC230_2: C230.2 U18.6 | length 1.3
  Top Layer w0.2: C230.2@10.919,18.144 10.919,18.139 11.173,17.884 U18.6@12.125,17.884
NetC231_2: C231.2 U20.6 | length 1.7
  Top Layer w0.2: C231.2@12.027,23.684 12.197,23.514 12.427,23.514 12.975,22.967 13.099,22.967 13.274,22.792 U20.6@13.399,22.792
NetC232_1: C232.1 R41.2 T2.4 | length 3.9
  Top Layer w0.165: v1(27.405,36.102) 27.92,36.102 ccw(c27.92,36.823) T2.4@28.641,36.823
  Bottom Layer w0.165: C232.1@27.236,33.899 27.236,35.933 cw(c27.405,35.933) v1(27.405,36.102)
NetC232_2: C232.2 R57.2 U17.17 | length 1.1
  Top Layer w0.165: U17.17@25.342,33.843 U17.17@25.334,33.836 v1(26.315,33.836) R57.2@26.403,33.924
NetC240_1: C240.1 R101.1 R131.2 U32.13 | length 2.9
  Top Layer w0.2: C240.1@81.964,34.858 C240.1@81.974,34.858 ; U32.13@82.107,33.88 82.107,34.725 C240.1@81.974,34.858 ; R101.1@83.767,35.024 83.749,35.006 R131.2@82.828,35.006 82.68,34.858 C240.1@81.974,34.858
NetC242_1: C242.1 R134.2 R135.1 U33.13 | length 4
  Top Layer w0.2: U33.13@27.709,89.408 27.709,88.147 v1(27.837,88.019)
  Top Layer w0.3: v1(27.837,88.019) R134.2@28.827,88.019
  Layer 4 w0.3: v1(26.491,87.566) 27.384,87.566 v1(27.837,88.019)
NetC245_1: C245.1 R?.1@102.43,7.35 R?.1@106.755,7.35 U17.22 | length 15.7
  Top Layer w0.2: U17.22@25.334,36.336 v1(26.168,37.169) ; v1(25.347,45.812) 25.932,45.812 26.643,45.1 27.43,45.1 27.557,45.227 27.683,45.102 30.516,45.102
  Layer 3 w0.2: v1(25.347,45.812) 25.347,39.202 26.168,38.382 v1(26.168,37.169)
NetC246_1: C246.1 R56.1 R58.2 U17.21 | length 20.2
  Top Layer w0.2: 14.182,48.662 14.182,47.488 v1(14.238,47.432) 14.298,47.372 15.5,47.372 ; U17.21@25.334,35.836 25.359,35.861 25.391,35.829 v1(25.932,35.829)
  Bottom Layer w0.2: v1(14.238,47.432) 14.238,46.508 24.917,35.829 v1(25.932,35.829)
  other v1: 15.129,48.733
NetD1_2: D1.2 D2.6 R99.2 | length 2.2
  Bottom Layer w0.165: D1.2@42.307,128.668 R99.2@42.307,129.753 ; D2.6@42.307,130.881 42.299,130.881 42.299,129.754 R99.2@42.308,129.754
NetD3_1: D3.1 L3.1 U17.5 | length 13.6
  Top Layer w0.3: 19.746,34.111 20.425,34.111 20.65,34.336 U17.5@21.534,34.336
  Top Layer w0.5: L3.1@12.769,31.135 14.844,31.135 17.82,34.111 19.746,34.111
  Top Layer w2: D3.1@12.507,27.813 12.507,31.06 12.582,31.135 L3.1@12.769,31.135
NetD3_2: D3.2 U17.6 | length 14.6
  Top Layer w0.3: 19.746,33.411 20.432,33.411 20.832,33.811 21.509,33.811 U17.6@21.534,33.836
  Top Layer w0.5: D3.2@12.507,25.462 13.759,25.462 14.412,26.116 14.412,27.917 17.305,30.81 17.305,32.606 18.11,33.411 19.746,33.411
NetD4_1: D4.1 L5.1 U17.2 | length 14.9
  Top Layer w0.3: 20.417,36.178 20.735,35.861 U17.2@21.534,35.861
  Top Layer w0.5: 20.417,36.178 20.126,36.47 20.126,40.487 21.626,41.987 D4.1@21.626,42.052
  Top Layer w2: L5.1@17.955,47.067 17.955,44.992 20.56,42.387 21.356,42.387 21.626,42.117 D4.1@21.626,42.052
NetD4_2: D4.2 U17.1 | length 4
  Top Layer w0.3: 20.826,37.236 20.826,36.87 U17.1@21.334,36.361
  Top Layer w0.5: 20.826,37.236 20.826,38.901 21.241,39.316 21.241,39.57 21.372,39.701 D4.2@21.626,39.701
NetD5_1: D5.1 L6.1 U17.4 | length 12.9
  Top Layer w0.3: 19.78,34.836 U17.4@21.534,34.836
  Top Layer w0.5: D5.1@17.054,38.572 18.074,37.552 18.074,35.238 18.296,35.016 19.6,35.016 19.78,34.836
  Top Layer w2: L6.1@11.593,38.402 11.668,38.477 16.959,38.477 D5.1@17.054,38.572
NetD5_2: D5.2 U17.3 | length 8.7
  Top Layer w0.3: 20.095,35.511 20.245,35.361 21.509,35.361 U17.3@21.534,35.336
  Top Layer w0.5: D5.2@17.054,40.923 17.185,40.792 18.075,40.792 19.299,39.568 19.299,36.306 20.095,35.511
NetD6_1: D6.1 L7.1 U17.7 | length 9.8
  Top Layer w0.3: 20.029,32.547 20.393,32.911 20.639,32.911 21.039,33.311 21.156,33.311
  Top Layer w0.5: L7.1@20.029,27.6 20.029,32.547
  Top Layer w2: D6.1@17.054,27.269 19.955,27.269 20.03,27.344 L7.1@20.03,27.739
NetD6_2: D6.2 U17.8 | length 13.9
  Top Layer w0.5: D6.2@17.054,24.918 17.308,24.918 18.385,23.841 21.131,23.841 21.868,24.577 21.868,30.901 21.409,31.36 21.409,32.081 21.434,32.106 U17.8@21.434,32.711
NetD7_1: D7.1 R100.1 | length 1.3
  Top Layer w0.2: R100.1@24.255,16.456 24.281,16.431 D7.1@24.281,15.193
NetD8_1: D8.1 R132.1 | length 1.4
  Top Layer w0.3: D8.1@70.102,19.04 R132.1@70.102,20.393
NetD9_1: D9.1 R133.1 | length 1.4
  Top Layer w0.3: R133.1@21.302,15.23 21.32,15.211 22.636,15.211 D9.1@22.655,15.193
NetJ1_2: J1.2 R39.1 | length 3.2
  Bottom Layer w0.165: 38.161,135.215 R39.1@41.4,135.215
  other v2: 44.995,134.965
NetJ3_2: J3.2 R40.1 | length 4.4
  Bottom Layer w0.165: R40.1@43.2,124.547 47.557,124.547
  other v2: 54.391,124.297
NetJ4_2: J4.2 R99.1 | length 4.3
  Bottom Layer w0.165: R99.1@43.208,129.754 47.557,129.754
  other v2: 54.391,129.504
NetJ7_2: J7.2 R43.1 | length 2.5
  Bottom Layer w0.165: R43.1@43.2,107.457 J7.2@45.665,107.457
NetJ9_2: J9.2 R44.1 | length 3.2
  Bottom Layer w0.165: R44.1@42.8,93.432 J9.2@46.033,93.432
NetJ10_2: J10.2 R49.1 | length 2.4
  Bottom Layer w0.165: J10.2@36.556,88.352 R49.1@38.908,88.352
NetL1_1: L1.1 U13.5 | length 1.3
  Bottom Layer w0.165: U13.5@42.3,103.067 L1.1@42.3,104.406
NetL4_2: L4.2 U17.24 | length 2.2
  Top Layer w0.3: U17.24@24.184,36.986 24.209,37.011 24.209,37.486 24.979,38.255 25.342,38.255 L4.2@25.492,38.405
NetL9_1: L9.1 U30.7 | length 7.4
  Top Layer w0.2: v1(18.044,13.834) 18.044,14.72 L9.1@18.078,14.755 ; v1(20.029,17.642) 20.029,18.695 20.315,18.981 20.614,18.981 U30.7@20.639,19.006
  Layer 3 w0.2: v1(18.044,13.834) 18.044,15.657 v1(20.029,17.642)
NetR1_2: R1.2 R2.1 R5.2 | length 1.9
  Bottom Layer w0.165: R5.2@37.97,73.92 38.781,73.92 cw(c38.781,73.893) R2.1@38.809,73.893 ccw(c38.809,73.944) 38.859,73.944 R1.2@38.859,74.87
NetR9_1: R9.1 R10.2 R11.1 | length 1.8
  Bottom Layer w0.165: R10.2@39.698,74.87 39.698,73.951 ccw(c39.748,73.951) R11.1@39.748,73.9 cw(c39.769,73.9) 39.769,73.92 R9.1@40.587,73.92